# Altium PCB PCB_Abraxas_doable_2026-10-19.pcbdoc
Units mm, origin at the board's own origin, x right, y up, seen from the top; angles counter-clockwise.
Board outline 134.79 x 128.24 mm, 2 copper layers (Top Layer, Bottom Layer); 48 components, 43 nets, 205 pads, 31 vias.
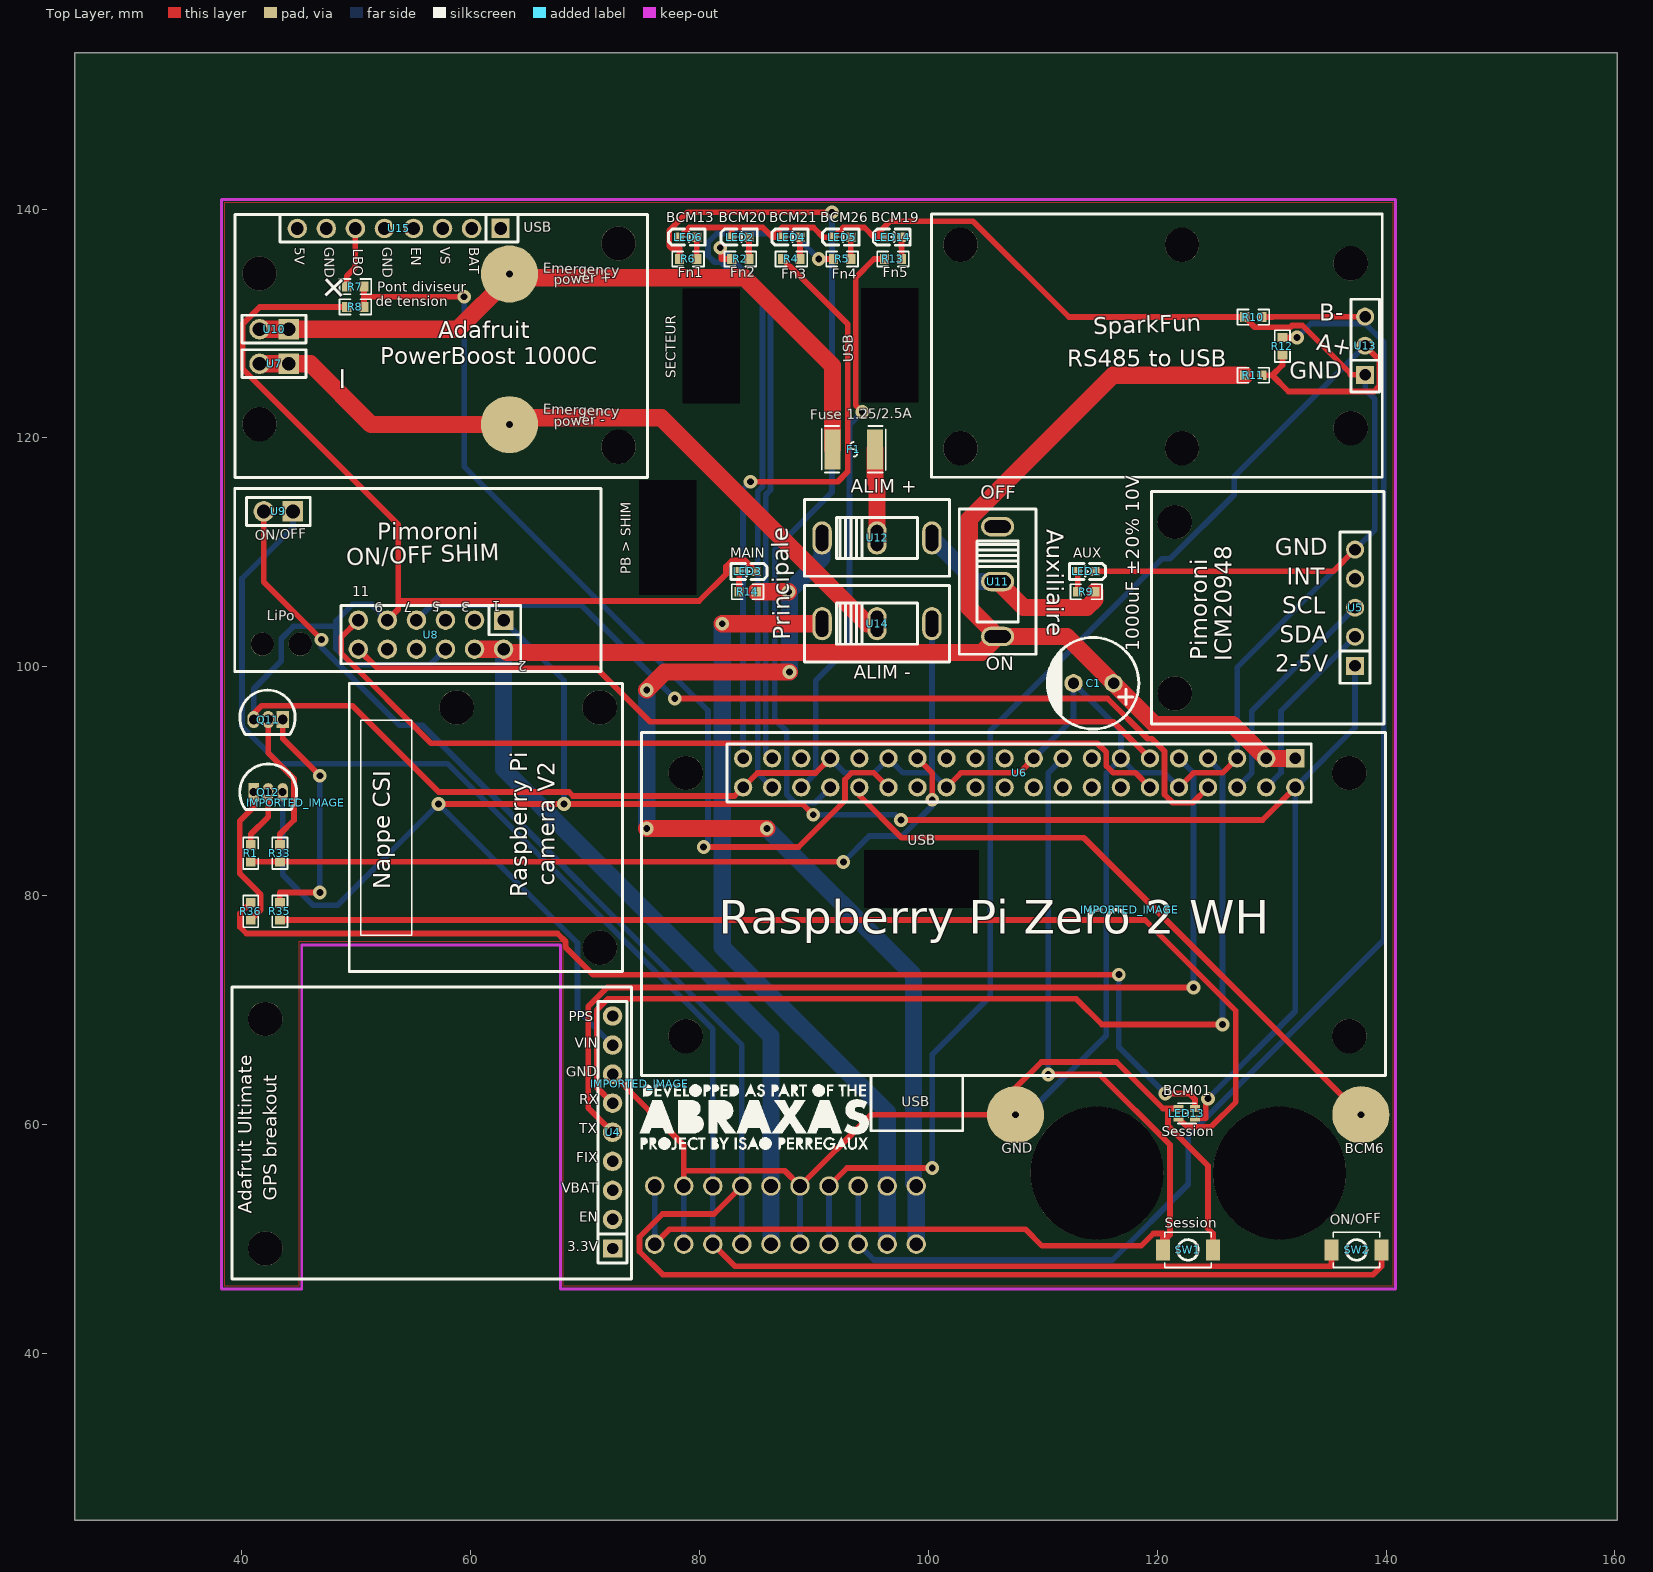
[diagram p0: Top Layer view]
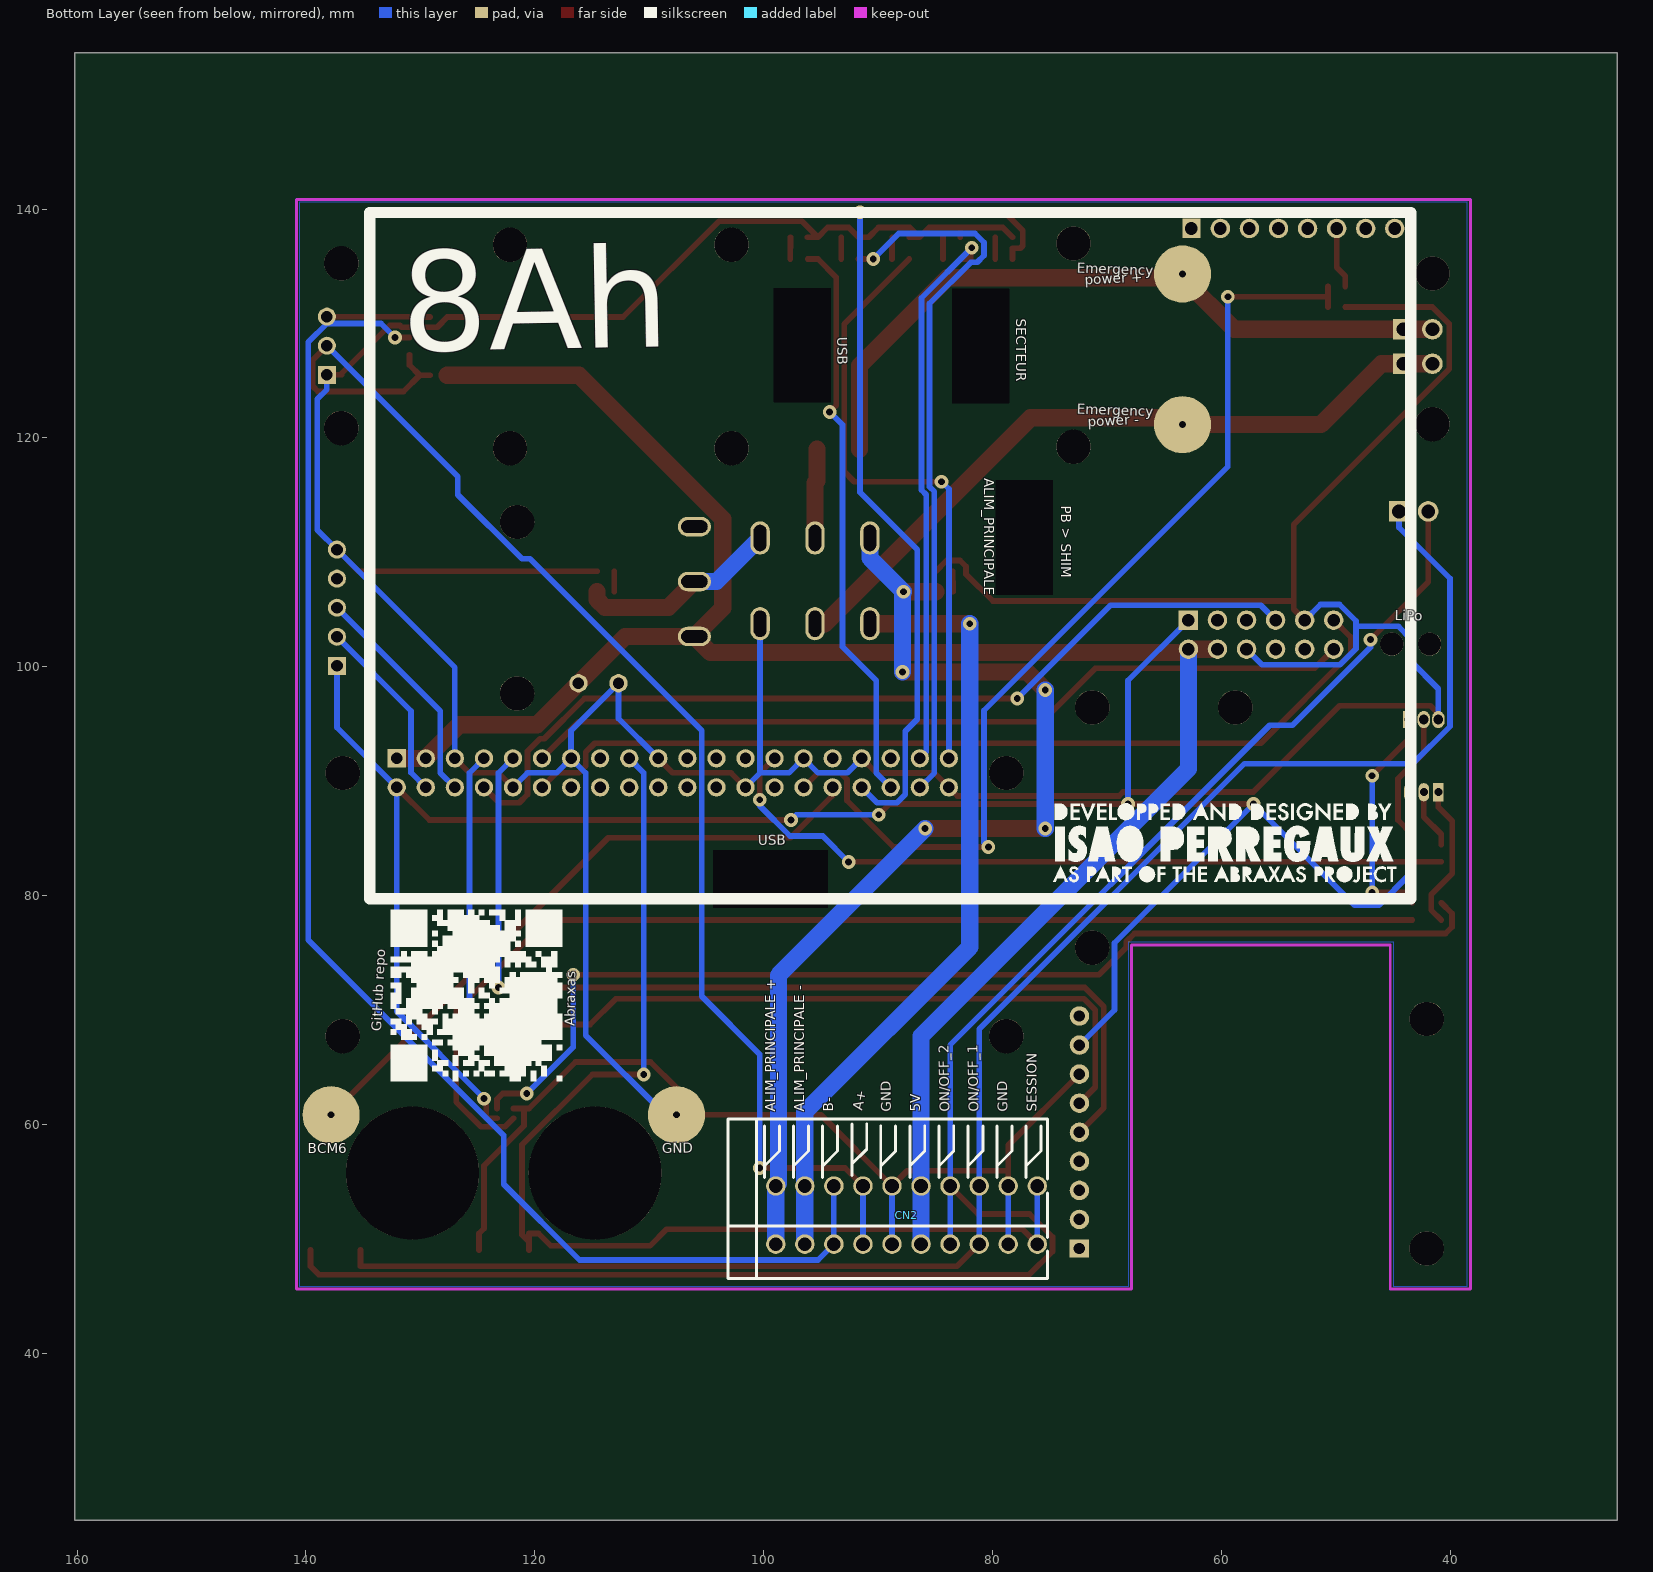
[diagram p1: Bottom Layer view, seen from below]

## Layer stack, top to bottom
Top Layer: signal copper (thickness not stored)
Dielectric: dielectric 0.32, FR-4, Dk 4.8
Bottom Layer: signal copper (thickness not stored)

## Board outline
160.187,25.4 25.4,25.4 25.4,153.641 160.187,153.641
cut-out: 78.526,133.037 78.526,123.037 83.526,123.037 83.526,133.037
cut-out: 74.716,116.273 74.716,106.273 79.716,106.273 79.716,116.273
cut-out: 94.107,133.092 94.107,123.092 99.107,123.092 99.107,133.092
cut-out: 104.394,83.943 94.394,83.943 94.394,78.943 104.394,78.943

## Components (designator, comment, footprint, x,y, rotation, side; value= is the part's Value field where it differs from the comment)
C1 "1000uF" CAP-TH_BD8.0-P3.50-D0.6-FD 114.427,98.548 r180 top
CN2 "DB141R-2.54-10P" CONN-TH_10P-P2.54_DIBO_DB141R-2.54-10P 87.503,52.066 r180 bottom
F1 "1.25A/2.5A" F1812 93.472,118.995 r180 top
IMPORTED_IMAGE "IMPORTED_IMAGE" IMPORTED_IMAGE 117.595,78.743 r0 top
IMPORTED_IMAGE "IMPORTED_IMAGE" IMPORTED_IMAGE 44.689,88.111 r0 top
IMPORTED_IMAGE "IMPORTED_IMAGE" IMPORTED_IMAGE 74.777,63.537 r0 top
LED1 "KT-0603R" LED-SMD_L1.6-W0.8-R-RD 113.792,108.327 r180 top
LED2 "KT-0603R" LED-SMD_L1.6-W0.8-R-RD 83.566,137.537 r0 top
LED3 "KT-0603R" LED-SMD_L1.6-W0.8-R-RD 84.201,108.327 r180 top
LED4 "KT-0603R" LED-SMD_L1.6-W0.8-R-RD 88.011,137.537 r0 top
LED5 "KT-0603R" LED-SMD_L1.6-W0.8-R-RD 92.456,137.537 r0 top
LED6 "KT-0603R" LED-SMD_L1.6-W0.8-R-RD 78.994,137.537 r0 top
LED13 "KT-0603RG" LED-SMD_4P-L1.6-W1.5_KT-0603RG 122.579,60.956 r0 top
LED14 "KT-0603R" LED-SMD_L1.6-W0.8-R-RD 96.901,137.537 r0 top
Q11 "NPN" TO-92-3_L4.8-W3.7-P1.27-R-1 42.291,95.373 r0 top
Q12 "PNP" TO-92-3_L4.9-W3.7-P1.27-L 42.291,89.023 r0 top
R1 "1kΩ" R0603 40.767,83.689 r90 top
R2 "220Ω" R0603 83.566,135.632 r0 top
R4 "220Ω" R0603 88.011,135.632 r0 top
R5 "220Ω" R0603 92.456,135.632 r0 top
R6 "220Ω" R0603 78.994,135.632 r0 top
R7 "1kΩ" R0603 49.911,133.219 r180 top
R8 "3.3kΩ" R0603 49.911,131.441 r0 top
R9 "510Ω" R0603 113.792,106.549 r180 top
R10 "4.7kΩ" R0603 128.397,130.552 r0 top
R11 "4.7kΩ" R0603 128.397,125.472 r0 top
R12 "120Ω" R0603 130.937,128.012 r90 top
R13 "220Ω" R0603 96.901,135.632 r0 top
R14 "510Ω" R0603 84.201,106.549 r180 top
R33 "1kΩ" R0603 43.307,83.689 r90 top
R35 "51Ω" R0603 43.307,78.609 r270 top
R36 "51Ω" R0603 40.767,78.609 r90 top
SW1 "TS-1088-AR02016" SW-SMD_L3.9-W3.0-P4.45 122.682,49.018 r0 top
SW2 "TS-1088-AR02016" SW-SMD_L3.9-W3.0-P4.45 137.414,49.018 r0 top
U4 "GPS" HDR-TH_9P-P2.54-V-F-4 72.39,59.305 r90 top
U5 "IMU" HDR-TH_5P-P2.54-V-F-B 137.287,105.152 r90 top
U6 "BX-PM2.54-2-20PY" HDR-TH_40P-P2.54-V-F-R2-C20-S2.54 107.93,90.717 r180 top
U7 "PB-" HDR-TH_2P-P2.54-V-F-1 42.808,126.476 r180 top
U8 "SHIM1" HDR-TH_12P-P2.54-V-F-R2-C6-S2.54 56.515,102.794 r180 top
U9 "SHIM2" HDR-TH_2P-P2.54-V-F-1 43.18,113.568 r180 top
U10 "PB+" HDR-TH_2P-P2.54-V-F-1 42.808,129.491 r180 top
U11 "SS12D10G5" SW-TH_SHOU-HAN_SS12D10G4 106.045,107.438 r270 top
U12 "SS12D10G5" SW-TH_SHOU-HAN_SS12D10G4 95.503,111.248 r0 top
U13 "RS485/USB" HDR-TH_3P-P2.54-V-F 138.166,128.051 r90 top
U14 "SS12D10G5" SW-TH_SHOU-HAN_SS12D10G4 95.503,103.755 r0 top
U15 "INFO_PINS" HDR-TH_8P-P2.54-V-F 53.721,138.299 r180 top
? "" ? 89.535,41.87 r0 top
? "" ? 144.14,93.214 r0 top

## Footprints (in the part's own frame and the unit in brackets; to place one, negate y for a bottom-side part, rotate by r counter-clockwise, add the part's x,y. Pads: shape width x height; smd on the part's side, far side on the other; paste and mask are expansions set on the pad)
CAP-TH_BD8.0-P3.50-D0.6-FD [mm]
  round 1.6 hole 1 paste+0 mask+0.051: 1(-1.75,0) 2(1.75,0)
  silkscreen extent -3.96,-4 4.04,4
CONN-TH_10P-P2.54_DIBO_DB141R-2.54-10P [mm]
  round 1.7 hole 1.2 paste+0 mask+0.05: 1(11.43,-2.54) 1(11.43,2.54) 2(8.89,-2.54) 2(8.89,2.54) 3(6.35,-2.54) 3(6.35,2.54) 4(3.81,-2.54) 4(3.81,2.54) 5(1.27,-2.54) 5(1.27,2.54) 6(-1.27,-2.54) 6(-1.27,2.54) 7(-3.81,-2.54) 7(-3.81,2.54) 8(-6.35,-2.54) 8(-6.35,2.54) 9(-8.89,-2.54) 9(-8.89,2.54) 10(-11.43,-2.54) 10(-11.43,2.54)
  silkscreen extent -15.59,-5.56 12.33,8.4
F1812 [mm]
  rect 1.407x3.499 smd paste-100 mask+0.051: 1(-1.853,0) 2(1.853,0)
  silkscreen extent -2.79,-2.03 2.79,2.03
HDR-TH_2P-P2.54-V-F-1 [mm]
  rect 1.8x1.8 hole 1.2 paste+0 mask+0.051: 1(-1.27,0)
  round 1.8 hole 1.2 paste+0 mask+0.051: 2(1.27,0)
  silkscreen extent -2.79,-1.22 2.79,1.22
HDR-TH_3P-P2.54-V-F [mil]
  rect 62x62 hole 40.16 paste+0 mask+2: 1(-100,0)
  round 62 hole 40.16 paste+0 mask+2: 2(0,0) 3(100,0)
  silkscreen extent -160,-49 160,49
HDR-TH_5P-P2.54-V-F-B [mil]
  rect 62x62 hole 40.16 paste+0 mask+2: 1(-200,0)
  round 62 hole 40.16 paste+0 mask+2: 2(-100,0) 3(0,0) 4(100,0) 5(200,0)
  silkscreen extent -260,-51 260,51
HDR-TH_8P-P2.54-V-F [mm]
  rect 1.575x1.7 hole 1.1 paste+0 mask+0.051: 1(-8.89,0)
  round 1.7 hole 1.1 paste+0 mask+0.051: 2(-6.35,0) 3(-3.81,0) 4(-1.27,0) 5(1.27,0) 6(3.81,0) 7(6.35,0) 8(8.89,0)
  silkscreen extent -10.4,-1.2 10.4,1.2
HDR-TH_9P-P2.54-V-F-4 [mm]
  rect 1.575x1.7 hole 1 paste+0 mask+0.051: 1(-10.16,0)
  round 1.7 hole 1 paste+0 mask+0.051: 2(-7.62,0) 3(-5.08,0) 4(-2.54,0) 5(0,0) 6(2.54,0) 7(5.08,0) 8(7.62,0) 9(10.16,0)
  silkscreen extent -11.43,-1.27 11.43,1.27
HDR-TH_12P-P2.54-V-F-R2-C6-S2.54 [mm]
  rect 1.7x1.7 hole 1.1 paste+0 mask+0.051: 1(-6.35,-1.27)
  round 1.7 hole 1.1 paste+0 mask+0.051: 2(-6.35,1.27) 3(-3.81,-1.27) 4(-3.81,1.27) 5(-1.27,-1.27) 6(-1.27,1.27) 7(1.27,-1.27) 8(1.27,1.27) 9(3.81,-1.27) 10(3.81,1.27) 11(6.35,-1.27) 12(6.35,1.27)
  silkscreen extent -7.85,-2.54 7.85,2.54
HDR-TH_40P-P2.54-V-F-R2-C20-S2.54 [mm]
  rect 1.6x1.6 hole 1 paste+0 mask+0.051: 1(-24.13,-1.27)
  round 1.6 hole 1 paste+0 mask+0.051: 2(-24.13,1.27) 3(-21.59,-1.27) 4(-21.59,1.27) 5(-19.05,-1.27) 6(-19.05,1.27) 7(-16.51,-1.27) 8(-16.51,1.27) 9(-13.97,-1.27) 10(-13.97,1.27) 11(-11.43,-1.27) 12(-11.43,1.27) 13(-8.89,-1.27) 14(-8.89,1.27) 15(-6.35,-1.27) 16(-6.35,1.27) 17(-3.81,-1.27) 18(-3.81,1.27) 19(-1.27,-1.27) 20(-1.27,1.27) 21(1.27,-1.27) 22(1.27,1.27) 23(3.81,-1.27) 24(3.81,1.27) 25(6.35,-1.27) 26(6.35,1.27) 27(8.89,-1.27) 28(8.89,1.27) 29(11.43,-1.27) 30(11.43,1.27) 31(13.97,-1.27) 32(13.97,1.27) 33(16.51,-1.27) 34(16.51,1.27) 35(19.05,-1.27) 36(19.05,1.27) 37(21.59,-1.27) 38(21.59,1.27) 39(24.13,-1.27) 40(24.13,1.27)
  silkscreen extent -25.53,-2.54 25.53,2.54
IMPORTED_IMAGE [mm]
LED-SMD_4P-L1.6-W1.5_KT-0603RG [mm]
  rect 0.85x0.6 smd paste+0 mask+0.051: 1(-0.725,0.425) 2(0.725,0.425) 3(0.725,-0.425) 4(-0.725,-0.425)
  silkscreen extent -0.8,-0.89 0.8,0.89
LED-SMD_L1.6-W0.8-R-RD [mm]
  rect 0.8x0.8 smd paste+0 mask+0.051: 1(0.75,0) 2(-0.75,0)
  silkscreen extent -1.7,-0.7 1.47,0.7
R0603 [mm]
  rect 0.806x0.864 smd paste-100 mask+0.051: 1(-0.753,0) 2(0.753,0)
  silkscreen extent -1.39,-0.66 1.39,0.66
SW-SMD_L3.9-W3.0-P4.45 [mm]
  rect 1.23x1.86 smd paste+0 mask+0.051: 1(-2.185,0) 2(2.185,0)
  silkscreen extent -2.03,-1.54 2.03,1.54
SW-TH_SHOU-HAN_SS12D10G4 [mm]
  oval 1.7x2.9 hole 1.1 slot 2.3 at 90 deg paste+0 mask+0.05: 1(-4.8,0) 2(0,0) 3(4.8,0)
  silkscreen extent -6.35,-3.35 6.35,3.35
TO-92-3_L4.8-W3.7-P1.27-R-1 [mm]
  rect 1.07x1.5 hole 0.85 paste+0 mask+0.051: 1(1.27,0)
  oval 1.07x1.5 hole 0.85 paste+0 mask+0.051: 2(0,0) 3(-1.27,0)
  silkscreen extent -2.48,-1.3 2.36,2.58
TO-92-3_L4.9-W3.7-P1.27-L [mm]
  rect 0.9x1.6 hole 0.7 paste+0 mask+0.051: 1(-1.27,0)
  oval 0.9x1.6 hole 0.7 paste+0 mask+0.051: 2(0,0) 3(1.27,0)
  silkscreen extent -2.48,-1.5 2.48,2.48
? [mm]

## Free pads (board coordinates)
  round 5 hole 0.6 paste+0 mask+0.051: 3(63.373,121.154) 3(63.373,134.317) 3(107.611,60.829) 3(137.795,60.829)
  round 3 hole 3 unplated paste+0: ""(41.529,121.2) ""(41.529,134.362) ""(42.037,49.145) ""(42.037,69.211) ""(58.772,96.438) ""(71.271,96.438) ""(71.272,75.438) ""(72.908,119.211) ""(72.908,136.991) ""(78.783,67.709) ""(78.783,90.709) ""(102.806,119.091) ""(102.806,136.871) ""(121.539,97.659) ""(121.539,112.645) ""(122.166,119.091) ""(122.166,136.871) ""(136.784,67.709) ""(136.784,90.709) ""(136.906,120.851) ""(136.906,135.251)
  round 2.032 hole 2.032 unplated paste+0: ""(41.783,101.977) ""(45.085,101.977)
  round 11.6 hole 11.6 unplated paste+0: ""(114.723,55.749) ""(130.683,55.749)

## Via types
v1: diameter 1.2, hole 0.6, Top Layer to Bottom Layer, tented both sides, 31 vias

## Nets (pads, with @x,y where several pads share a name; then routed paths per layer and width w, separated by ;. In a path a pad name is that pad's centre, name@x,y a point inside that pad or via, vN(x,y) a via of type N, cw(c..) or ccw(c..) an arc to the next point about the centre after c; other vN are vias at no path point)
3.3V: LED13.3 Q12.3 U4.8 U5.1 U6.2 U8.1 | length 193.7
  Top Layer w0.5: v1(57.185,87.989) v1(68.144,87.989) 88.991,87.989 v1(89.925,87.055) ; v1(97.591,86.596) 129.209,86.596 U6.2 ; LED13.3 124.229,60.531 124.229,62.046 v1(124.427,62.244)
  Bottom Layer w0.5: Q12.3 43.561,81.805 46.231,79.135 48.331,79.135 v1(57.185,87.989) 69.32,75.855 69.32,69.995 U4.8 ; U8.1 68.144,98.785 v1(68.144,87.989) ; v1(89.925,87.055) 97.133,87.055 v1(97.591,86.596) ; v1(124.427,62.244) 132.06,69.877 U6.2 137.287,94.674 U5.1
5V: C1.1 CN2.5 R11.1 U6.1 U6.3 U8.2 U8.4 U11.3 | length 179.1
  Top Layer w1.5: U8.4 U8.2 63.161,101.228 104.634,101.228 U11.3 ; R11.1 116.131,125.472 103.566,112.908 103.566,105.117 U11.3 ; U6.1 U6.3 126.591,94.917 119.809,94.917 C1.1 112.087,102.638 U11.3
  Bottom Layer w1.5: U8.2 62.865,91.074 86.233,67.706 86.233,54.606 CN2.5@86.233,49.526
A+: CN2.7 R11.2 R12.1 U13.2 | length 120
  Top Layer w0.5: CN2.7@91.313,54.606 92.887,56.18 v1(100.333,56.18) ; R11.2 130.054,125.472 ; R12.1 130.937,126.355 130.054,125.472 ; U13.2 139.405,126.813 139.405,124.501 138.955,124.051 131.475,124.051 130.054,125.472
  Bottom Layer w0.5: CN2.7@91.313,49.526 CN2.7@91.313,54.606 ; v1(100.333,56.18) 100.333,66.113 105.408,71.188 105.408,94.414 120.418,109.424 121.121,109.424 126.725,115.028 126.725,116.611 U13.2
ALIM+: F1.2 pad.3@63.373,134.317 U10.1 U10.2 | length 62.9
  Top Layer w1.5: U10.2 U10.1 58.861,129.491 63.373,134.003 63.373,134.317 63.701,133.989 83.927,133.989 91.619,126.298 F1.2
ALIM-: pad.3@63.373,121.154 U7.1 U7.2 U14.2 | length 63.9
  Top Layer w1.5: U7.2 U7.1 45.979,126.476 51.301,121.154 63.373,121.154 63.97,121.751 76.657,121.751 94.654,103.755 U14.2
ALIM_PRINCIPALE+: CN2.10 R14.1 U12.1 | length 93.3
  Top Layer w1.5: v1(75.38,85.849) v1(85.875,85.849) ; v1(75.38,97.959) 76.946,99.526 v1(87.861,99.526) ; R14.1 v1(87.769,106.549)
  Bottom Layer w1.5: v1(75.38,85.849) v1(75.38,97.959) ; v1(85.875,85.849) 98.706,73.018 98.706,54.833 98.933,54.606 CN2.10@98.933,49.526 ; v1(87.861,99.526) 87.861,106.457 v1(87.769,106.549) 90.703,109.484 U12.1
ALIM_PRINCIPALE-: CN2.9 U14.1 | length 68.9
  Top Layer w1.5: v1(81.978,103.755) U14.1
  Bottom Layer w1.5: v1(81.978,103.755) 81.978,75.484 96.393,61.07 96.393,54.606 CN2.9@96.393,49.526
ALIM_SECONDAIRE+: R9.1 U11.2 U12.3 | length 17.7
  Top Layer w1.5: U11.2 108.318,105.165 113.855,105.165 114.545,105.856 R9.1
  Bottom Layer w1.5: U12.3 104.113,107.438 U11.2
B-: CN2.8 R10.2 R12.2 U13.3 | length 137.6
  Top Layer w0.5: R10.2 130.054,130.552 130.093,130.591 U13.3 ; R12.2 v1(132.206,128.766)
  Bottom Layer w0.5: CN2.8@93.853,54.606 93.853,49.526 95.243,48.136 116.075,48.136 122.703,54.764 122.703,59.033 139.789,76.119 139.789,128.373 U13.3@138.166,129.995 ; v1(132.206,128.766) 133.435,129.995 U13.3@138.166,129.995 ; U13.3 U13.3@138.166,129.995
BCM1: R1.1 R33.1 U6.27 | length 66.3
  Top Layer w0.5: R1.1 R33.1 v1(92.561,82.936) ; U6.27 100.328,90.699 v1(100.328,88.372)
  Bottom Layer w0.5: v1(92.561,82.936) 94.825,85.199 97.682,85.199 100.328,87.845 v1(100.328,88.372)
BCM5: R7.1 R8.2 U6.30 | length 88.1
  Top Layer w0.5: R8.2 50.664,132.33 ; R7.1 50.664,132.33 ; v1(59.418,132.33) 50.664,132.33 ; v1(80.354,84.228) 88.634,84.228 92.708,88.302 92.708,90.142 93.283,90.717 95.23,90.717 U6.30
  Bottom Layer w0.5: v1(59.418,132.33) 59.418,117.481 80.735,96.165 80.735,84.609 v1(80.354,84.228)
BCM6: pad.3@137.795,60.829 U6.32 | length 56.1
  Top Layer w0.5: U6.32 93.96,88.741 97.655,85.046 113.578,85.046 pad.3@137.795,60.829
BCM13: R6.1 U6.34 | length 76.2
  Top Layer w0.5: R6.1 78.241,136.565 77.564,136.565 77.338,136.79 77.338,138.117 78.936,139.714 v1(91.561,139.714)
  Bottom Layer w0.5: U6.34 90.079,88.106 88.337,88.106 87.61,88.834 87.61,94.35 86.559,95.401 86.559,110.243 91.561,115.245 v1(91.561,139.714)
BCM19: R13.1 U6.36 | length 50.2
  Top Layer w0.5: v1(94.222,122.259) 93.655,122.825 93.655,134.044 95.244,135.632 R13.1
  Bottom Layer w0.5: U6.36 90.15,90.717 90.15,98.788 93.103,101.741 93.103,121.14 v1(94.222,122.259)
BCM20: R2.1 U6.37 | length 48.8
  Top Layer w0.5: v1@81.805,136.613 81.909,136.509 81.909,135.632 R2.1
  Bottom Layer w0.5: v1@81.805,136.613 86.19,132.228 86.19,115.439 85.771,115.021 85.771,92.556 U6.37
  other v1: 81.805,136.613
BCM21: R4.1 U6.39 | length 54.3
  Top Layer w0.5: v1(84.437,116.166) 92.074,116.166 92.954,117.046 92.954,129.936 R4.1
  Bottom Layer w0.5: U6.39 83.8,115.529 v1(84.437,116.166)
BCM26: R5.1 U6.38 | length 62.8
  Top Layer w0.5: v1(90.413,135.632) 90.799,135.632 R5.1
  Bottom Layer w0.5: U6.38 85.07,90.717 85.07,115.312 85.488,115.73 85.488,131.735 81.881,135.343 81.323,135.343 80.734,135.931 80.734,137.073 81.521,137.859 88.186,137.859 v1(90.413,135.632)
F1_1: F1.1 U12.2 | length 7.8
  Top Layer w1.5: F1.1 95.325,116.245 95.503,116.067 U12.2
GND: C1.2 CN2.2 CN2.6 LED1.2 LED2.2 LED3.2 LED4.2 LED5.2 LED6.2 LED13.1 LED14.2 pad.3@107.611,60.829 Q11.3 R8.1 R10.1 SW1.2 U4.7 U5.5 U6.5 U6.10 U6.13 U6.19 U6.26 U6.29 U6.33 U6.40 U8.6 U8.9 U13.1 U14.3 | length 482.4
  Top Layer w0.5: Q11.3 41.021,95.896 41.699,96.575 49.667,96.575 57.202,89.041 68.579,89.041 68.919,88.701 83.054,88.701 U6.40 85.052,90.699 90.132,90.699 U6.33 ; R8.1 41.551,131.441 40.073,129.962 40.073,126.017 53.656,112.434 53.656,105.732 ; U8.9 53.656,105.015 53.656,105.732 ; U4.7 78.613,58.162 78.613,55.94 ; LED6.2 79.096,138.389 82.816,138.389 ; CN2.2@78.613,54.606 78.613,55.94 ; LED2.2 82.816,138.389 ; LED3.2 83.997,109.281 82.825,109.281 82.3,108.756 82.3,108.077 79.955,105.732 53.656,105.732 ; LED4.2 86.361,137.537 ; LED14.2 95.251,137.537 ; U6.26 102.85,90.717 107.93,90.717 U6.19 ; LED1.2 135.382,108.327 U5.5 ; LED13.1 120.928,61.381 ; U6.10 123.17,90.717 125.71,90.717 U6.5 ; SW1.2 124.867,50.449 124.431,50.885 124.431,56.375 120.928,59.878 120.928,61.381 ; U13.1 136.878,125.511 136.878,125.622 132.68,129.82 131.773,129.82 131.622,129.669 128.527,129.669 R10.1 126.74,130.552 112.278,130.552 103.897,138.933 96.646,138.933 95.251,137.537 ; 78.613,55.94 87.439,55.94 88.773,54.606 94.996,60.829 107.611,60.829 107.611,63.187 109.876,65.452 116.437,65.452 120.508,61.381 120.928,61.381 ; 82.816,138.389 85.509,138.389 86.361,137.537 ; 86.361,137.537 87.212,138.389 89.954,138.389 90.806,137.537 LED5.2 92.558,138.389 94.399,138.389 95.251,137.537
  Bottom Layer w0.5: Q11.3 41.021,98.072 43.434,100.485 43.434,102.445 44.508,103.52 48.22,103.52 ; U8.9 51.329,105.441 49.66,105.441 48.22,104 48.22,103.52 ; U8.6 56.43,100.169 49.622,100.169 48.22,101.571 48.22,103.52 ; CN2.2@78.613,49.526 CN2.2@78.613,54.606 ; CN2.6@88.773,49.526 CN2.6@88.773,54.606 ; U6.33 92.69,90.717 95.23,90.717 U6.29 97.77,90.717 100.303,90.717 ; U14.3 100.303,90.717 ; U6.26 100.31,90.717 100.303,90.717 ; pad.3@107.611,60.829 108.596,60.829 115.55,67.784 115.55,90.717 U6.13 ; U6.19 112.677,95.464 C1.2 116.82,94.405 U6.13 ; U6.10 120.63,90.717 118.09,90.717 U6.13 ; U6.5 126.98,99.925 U5.5 139.008,111.953 139.008,123.382 138.166,124.223 U13.1
LBO: R7.2 U15.6 | length 5.4
  Top Layer w0.5: R7.2 49.158,134.152 49.911,134.905 U15.6
LED1_1: LED1.1 R9.2 | length 1.8
  Top Layer w0.5: R9.2 113.039,107.423 113.042,107.427 LED1.1
LED2_1: LED2.1 R2.2 | length 1.9
  Top Layer w0.5: LED2.1 84.316,136.637 84.319,136.633 R2.2
LED3_1: LED3.1 R14.2 | length 1.8
  Top Layer w0.5: R14.2 83.448,107.423 83.451,107.427 LED3.1
LED4_1: LED4.1 R4.2 | length 1.9
  Top Layer w0.5: LED4.1 88.761,136.568 88.764,136.565 R4.2
LED5_1: LED5.1 R5.2 | length 1.9
  Top Layer w0.5: LED5.1 93.206,136.637 93.209,136.633 R5.2
LED6_1: LED6.1 R6.2 | length 1.9
  Top Layer w0.5: LED6.1 79.744,136.637 79.747,136.633 R6.2
LED14_1: LED14.1 R13.2 | length 1.9
  Top Layer w0.5: LED14.1 97.651,136.637 97.654,136.633 R13.2
ON/OFF_1: CN2.3 SW2.1 U9.1 | length 147.9
  Top Layer w0.5: CN2.3@81.153,49.526 83.092,47.588 135.229,47.588 SW2.1
  Bottom Layer w0.5: U9.1 44.45,112.167 39.998,107.716 39.998,94.78 43.253,91.525 57.952,91.525 81.153,68.324 81.153,54.606 CN2.3@81.153,49.526
ON/OFF_2: CN2.4 SW2.2 U9.2 | length 162
  Top Layer w0.5: U9.2 41.91,107.396 v1(46.945,102.361) ; CN2.4@83.693,54.606 81.256,52.169 76.756,52.169 74.748,50.161 74.748,48.891 76.778,46.861 138.872,46.861 139.599,47.588 SW2.2
  Bottom Layer w0.5: v1(46.945,102.361) 46.945,101.697 53.77,94.873 55.757,94.873 83.693,66.937 83.693,54.606 CN2.4@83.693,49.526
PIN12: U6.11 U8.12 | length 73.1
  Top Layer w0.5: U8.12 51.835,99.854 70.999,99.854 75.667,95.187 116.16,95.187 U6.11
POWER_WITNESS: U6.8 U8.7 | length 79.6
  Top Layer w0.5: v1(77.822,97.217) 115.65,97.217 119.17,93.697 119.535,93.697 120.63,92.602 120.63,88.834 121.357,88.106 123.099,88.106 U6.8
  Bottom Layer w0.5: U8.7 56.546,105.366 69.673,105.366 v1(77.822,97.217)
Q11_1: Q11.1 R35.1 | length 20.9
  Top Layer w0.5: R35.1 43.307,80.266 v1(46.806,80.266) ; Q11.1 43.561,93.709 v1(46.806,90.463)
  Bottom Layer w0.5: v1(46.806,80.266) v1(46.806,90.463)
Q11_2: Q11.2 R33.2 | length 12.4
  Top Layer w0.5: Q11.2 42.291,92.456 44.548,90.199 44.548,86.587 43.307,85.346 R33.2
Q12_1: Q12.1 R36.1 | length 12.8
  Top Layer w0.5: R36.1 41.651,78.74 41.651,80.071 39.808,81.914 39.808,86.509 41.021,87.723 Q12.1
Q12_2: Q12.2 R1.2 | length 5.2
  Top Layer w0.5: R1.2 40.767,85.346 42.291,86.87 Q12.2
R35_2: LED13.4 R35.2 | length 101
  Top Layer w0.5: R35.2 118.925,77.856 126.868,69.913 126.868,61.944 124.704,59.78 122.606,59.78 LED13.4
R36_2: LED13.2 R36.2 | length 97
  Top Layer w0.5: R36.2 39.826,78.422 39.826,77.235 40.388,76.673 67.583,76.673 68.304,75.952 68.304,75.45 70.675,73.079 v1@116.643,73.079 ; v1(120.691,62.684) 122.802,62.684 123.304,62.182 LED13.2
  Bottom Layer w0.5: v1@116.643,73.079 116.643,66.732 v1(120.691,62.684)
  other v1: 116.643,73.079
RX/TX: U4.5 U6.9 | length 86
  Top Layer w0.5: U4.5 70.269,61.426 70.269,70.286 71.931,71.947 v1(123.17,71.947)
  Bottom Layer w0.5: U6.9 123.17,90.717 v1(123.17,71.947)
SCL: U5.3 U6.6 | length 20
  Bottom Layer w0.5: U6.6 128.25,90.717 128.25,96.115 U5.3
SDA: U5.2 U6.4 | length 16.4
  Bottom Layer w0.5: U6.4 130.808,90.735 130.808,96.133 U5.2
SESSION: CN2.1 SW1.1 U6.17 | length 102.6
  Top Layer w0.5: CN2.1@76.073,49.526 77.374,50.828 108.471,50.828 109.923,49.376 118.588,49.376 119.661,50.449 120.497,50.449 SW1.1@120.497,49.734 ; v1(110.47,64.361) 114.956,64.361 121.111,58.207 121.111,50.347 SW1.1@120.497,49.734 ; SW1.1 SW1.1@120.497,49.734
  Bottom Layer w0.5: CN2.1@76.073,49.526 CN2.1@76.073,54.606 ; v1(110.47,64.361) 110.47,90.717 U6.17
SHUTDOWN: U6.12 U8.11 | length 79.8
  Top Layer w0.5: U8.11 48.687,102.586 48.687,101.151 56.531,93.307 114.759,93.307 115.55,92.516 115.55,91.31 116.124,90.735 118.072,90.735 U6.12
TX/RX: U4.6 U6.7 | length 88.6
  Top Layer w0.5: U4.6 71.004,63.231 71.004,69.993 71.982,70.971 112.906,70.971 115.156,68.722 v1(125.71,68.722)
  Bottom Layer w0.5: U6.7 125.71,90.717 v1(125.71,68.722)
pads on no net: U4.1 U4.2 U4.3 U4.4 U4.9 U5.4 U6.14 U6.15 U6.16 U6.18 U6.20 U6.21 U6.22 U6.23 U6.24 U6.25 U6.28 U6.31 U6.35 U8.3 U8.5 U8.8 U8.10 U11.1 U15.1 U15.2 U15.3 U15.4 U15.5 U15.7 U15.8

## Polygon pours and split planes (outlines as drawn)
GND on Bottom Layer (solid): 38.608,140.585 140.462,140.585 140.589,140.585 140.589,45.843 68.072,45.843 68.072,75.942 44.958,75.942 44.958,45.843 38.481,45.843 38.481,140.585
GND on Top Layer (solid): 38.608,140.585 140.462,140.585 140.589,140.585 140.589,45.843 68.072,45.843 68.072,75.942 44.958,75.942 44.958,45.843 38.481,45.843 38.481,140.585

## Silkscreen, mask and mechanical layers (free items; w line width, h text height)
Top Overlay:
  lines w0.127: 50.389,76.54 54.834,76.54 54.834,95.336 50.389,95.336 50.389,76.54
  lines w0.254: 39.116,46.478 74.041,46.478 74.041,72.005 39.116,72.005 39.116,46.478 ; 39.37,99.564 71.374,99.564 71.374,115.566 39.37,115.566 39.37,99.564 ; 39.38,116.544 75.448,116.544 75.448,139.531 39.38,139.531 39.38,116.544 ; 49.373,73.365 73.249,73.365 73.249,98.511 49.373,98.511 49.373,73.365 ; 74.93,64.258 139.954,64.258 139.954,94.23 74.93,94.23 74.93,64.258 ; 94.996,59.432 102.997,59.432 102.997,64.258 94.996,64.258 94.996,59.432 ; 100.266,116.551 139.666,116.551 139.666,139.551 100.266,139.551 100.266,116.551 ; 119.507,94.992 139.827,94.992 139.827,115.312 119.507,115.312 119.507,94.992
  text "BCM13" at 77.089,138.553 h1.5
  text "BCM20" at 81.661,138.553 h1.5
  text "BCM21" at 86.106,138.553 h1.5
  text "BCM26" at 90.551,138.553 h1.5
  text "BCM19" at 94.996,138.553 h1.5
  text "USB" at 64.643,137.664 h1.5 r1
  text "5V" at 44.323,136.648 h1.5 r270
  text "GND" at 46.863,136.648 h1.5 r271
  text "GND" at 51.943,136.648 h1.5 r271
  text "EN" at 54.483,136.648 h1.5 r270
  text "VS" at 57.023,136.648 h1.5 r271
  text "BAT" at 59.563,136.648 h1.5 r270
  text "LBO" at 49.403,136.521 h1.5 r270
  text "Emergency" at 66.294,134.108 h1.5 r358
  text "Fn1" at 78.088,133.727 h1.5
  text "Fn2" at 82.66,133.727 h1.5 r1
  text "Fn5" at 96.012,133.727 h1.5
  text "Fn3" at 87.122,133.6 h1.5
  text "Fn4" at 91.567,133.6 h1.5
  text "power +" at 67.31,133.092 h1.5 r3
  text "Pont diviseur" at 51.816,132.457 h1.5
  text "de tension" at 51.689,131.187 h1.5
  text "+" at 48.27,130.895 h4 r43
  text "B-" at 134.141,129.741 h2.5
  text "SparkFun" at 114.427,128.52 h2.5 r2
  text "Adafruit" at 57.16,128.228 h2.5
  text "A+" at 133.76,127.201 h2.5 r349
  text "USB" at 93.726,126.615 h1.5 r91
  text "_" at 48.651,125.942 h4 r270
  text "PowerBoost 1000C" at 52.08,125.942 h2.5
  text "RS485 to USB" at 112.141,125.726 h2.5
  text "SECTEUR" at 78.232,125.218 h1.5 r90
  text "GND" at 131.594,124.641 h2.5 r1
  text "Emergency" at 66.294,121.789 h1.5 r358
  text "Fuse 1.25/2.5A" at 89.662,121.281 h1.5 r1
  text "power -" at 67.31,120.646 h1.5 r3
  text "ALIM +" at 93.218,114.804 h2
  text "OFF" at 104.521,114.296 h2 r359
  text "Auxiliaire" at 109.855,112.01 h2.5 r270
  text "ON/OFF" at 41.148,110.74 h1.5 r2
  text "Pimoroni" at 51.816,110.613 h2.5
  text "MAIN" at 82.677,109.216 h1.5
  text "AUX" at 112.649,109.216 h1.5
  text "GND" at 130.302,109.216 h2.5 r1
  text "ON/OFF SHIM" at 49.149,108.327 h2.5 r2
  text "PB > SHIM" at 74.295,108.073 h1.5 r90
  text "INT" at 131.318,106.676 h2.5
  text "1" at 62.611,106.041 h1.5 r180
  text "9" at 52.324,105.914 h1.5 r182
  text "7" at 54.864,105.914 h1.5 r180
  text "5" at 57.404,105.914 h1.5 r173
  text "3" at 59.944,105.914 h1.5 r177
  text "11" at 49.657,105.859 h1.5
  text "SCL" at 130.937,104.136 h2.5
  text "LiPo" at 42.164,103.755 h1.5 r359
  text "Principale" at 88.392,102.358 h2.5 r91
  text "SDA" at 130.683,101.596 h2.5
  text "1000uF ±20% 10V" at 118.812,101.343 h2 r90
  text "2" at 64.897,100.797 h1.5 r181
  text "Pimoroni" at 124.841,100.58 h2.5 r90
  text "ICM20948" at 127,100.453 h2.5 r90
  text "ON" at 105.029,99.31 h2
  text "2-5V" at 130.302,99.056 h2.5
  text "ALIM -" at 93.472,98.548 h2
  text "USB" at 98.171,84.07 h1.5 r1
  text "camera V2" at 67.837,80.845 h2.5 r90
  text "Nappe CSI" at 53.461,80.534 h2.5 r90
  text "Raspberry Pi" at 65.424,79.829 h2.5 r90
  text "Raspberry Pi Zero 2 WH" at 81.661,75.688 h5
  text "PPS" at 68.575,68.681 h1.5
  text "VIN" at 69.083,66.395 h1.5
  text "GND" at 68.321,63.855 h1.5 r1
  text "BCM01" at 120.523,62.226 h1.5
  text "RX" at 69.464,61.442 h1.5
  text "USB" at 97.663,61.21 h1.5 r1
  text "TX" at 69.464,58.902 h1.5
  text "Session" at 120.384,58.671 h1.5
  text "GND" at 106.426,57.146 h1.5 r1
  text "BCM6" at 136.398,57.146 h1.5
  text "FIX" at 69.215,56.384 h1.5
  text "VBAT" at 67.94,53.695 h1.5
  text "GPS breakout" at 43.413,53.333 h2 r90
  text "Adafruit Ultimate" at 41.233,52.187 h2 r90
  text "EN" at 69.464,51.155 h1.5
  text "ON/OFF" at 135.128,50.923 h1.5 r2
  text "Session" at 120.65,50.669 h1.5
  text "3.3V" at 68.448,48.615 h1.5
Bottom Overlay:
  lines w1: 43.434,79.696 134.434,79.696 134.434,139.696 43.434,139.696 43.434,79.696
  text "Emergency" at 72.644,134.108 h1.5 r2
  text "power +" at 71.882,133.092 h1.5 r357
  text "SECTEUR" at 78.232,130.425 h1.5 r90
  text "USB" at 93.853,128.774 h1.5 r89
  text "8Ah" at 131.567,124.688 h15 r359
  text "Emergency" at 72.644,121.789 h1.5 r2
  text "power -" at 71.628,120.646 h1.5 r357
  text "ALIM_PRINCIPALE" at 81.026,116.455 h1.5 r90
  text "PB > SHIM" at 74.295,114.042 h1.5 r90
  text "LiPo" at 44.831,103.755 h1.5 r1
  text "USB" at 100.457,84.07 h1.5 r359
  text "Abraxas" at 116.205,68.576 h1.5 r271
  text "GitHub repo" at 133.096,68.068 h1.5 r273
  text "SESSION" at 75.819,61.083 h1.5 r270
  text "GND" at 78.359,61.083 h1.5 r269
  text "ON/OFF_1" at 80.899,61.083 h1.5 r269
  text "ON/OFF_2" at 83.439,61.083 h1.5 r269
  text "5V" at 85.979,61.083 h1.5 r270
  text "GND" at 88.519,61.083 h1.5 r269
  text "A+" at 91.059,61.083 h1.5 r281
  text "B-" at 93.599,61.083 h1.5 r270
  text "ALIM_PRINCIPALE -" at 96.139,61.083 h1.5 r270
  text "ALIM_PRINCIPALE +" at 98.679,61.083 h1.5 r270
  text "GND" at 108.839,57.146 h1.5 r359
  text "BCM6" at 139.827,57.146 h1.5
Top Solder:
  lines w0.254: 119.456,94.941 139.878,94.941 139.878,115.363 119.456,115.363 119.456,94.941